# Altium PCB TB GPIO Trans Plug ver..PcbDoc
Units mil, origin at the board's own origin, x right, y up, seen from the top; angles counter-clockwise.
Board outline 825.58 x 762.57 mil, 2 copper layers (Top Layer, Bottom Layer); 4 components, 12 nets, 39 pads, 0 vias.
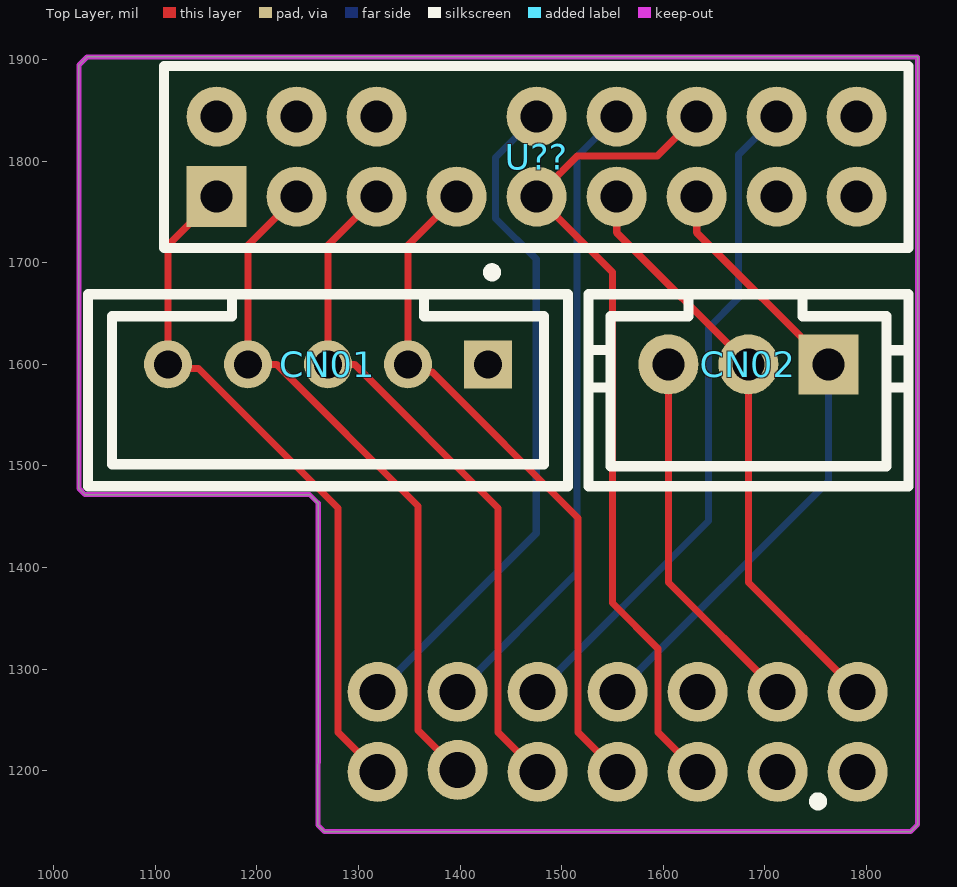
[diagram p0: Top Layer view]
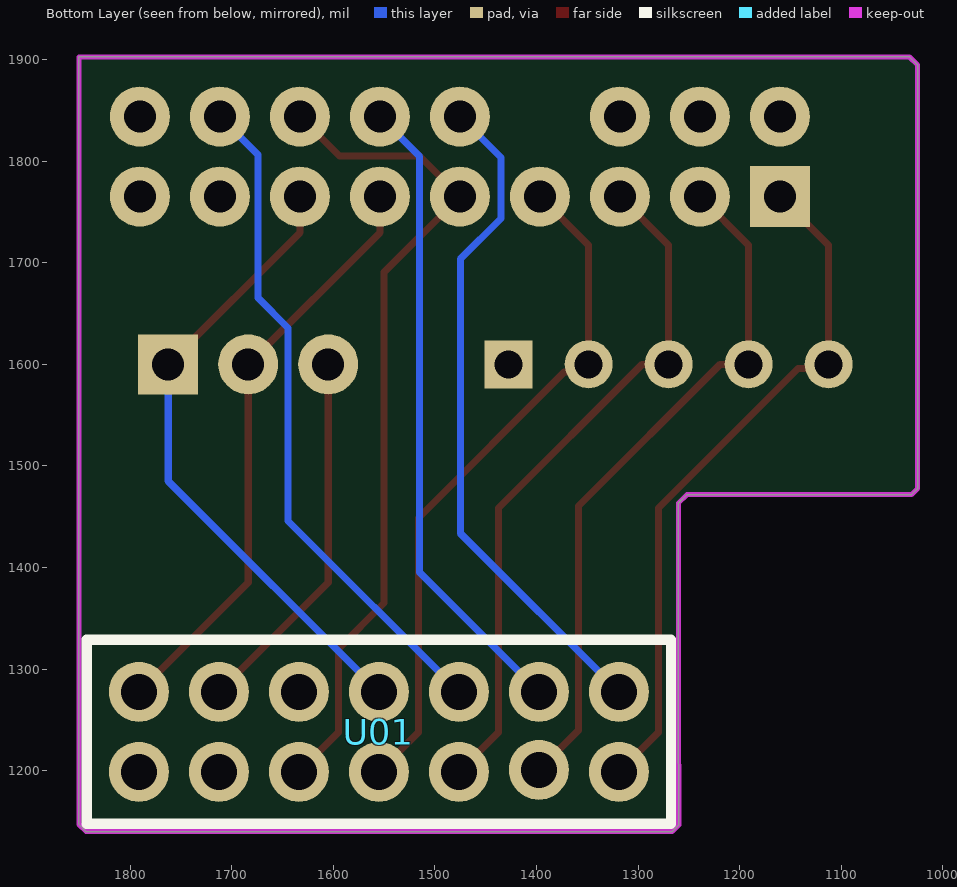
[diagram p1: Bottom Layer view, seen from below]

## Layer stack, top to bottom
Top Solder: solder mask 0.4, Solder Resist, Dk 3.5
Top Layer: signal copper 1.4
Dielectric 1: dielectric 12.6, FR-4, Dk 4.8
Bottom Layer: signal copper 1.4
Bottom Solder: solder mask 0.4, Solder Resist, Dk 3.5

## Board outline
1030.85,1471.72 1024.84,1477.73 1024.84,1894.57 1032.84,1902.57 1850.42,1902.57 1850.42,1147.13 1843.3,1140 1266.59,1140 1259.99,1146.6 1260.42,1266.93 1260.42,1463.24 1251.94,1471.72

## Design rules (kind name [scope] priority, off if disabled: settings)
Clearance [All] p1: gap=4.5 ignorepadtopadclearanceinfootprint=FALSE
PolygonConnect [All] p1: connectstyle=Relief reliefconductorwidth=10 reliefentries=4 polygonreliefangle="90 Angle" airgapwidth=10
RoutingVias [All] p1: holewidth=28 width=50 viastyle="Through Hole" minholewidth=28 minwidth=50 maxholewidth=28 maxwidth=50
SolderMaskExpansion [All] p1: expansion=4 istentingtop=FALSE
Width [All] p1: maxlimit=30 minlimit=4 preferedwidth=7
30 further rules are at their usual default settings.

## Components (designator, comment, footprint, x,y, rotation, side; value= is the part's Value field where it differs from the comment)
CN01 "hx-ph2.0-5pzz" CONN-TH_HX-PH2.0-5PZZ 1270,1600 r0 top
CN02 "hx-ph2.0-3pzz-b" CONN-TH_HX-PH2.0-3PZZ-B 1683.74,1600 r180 top
U01 "pm200-2-07-s-4.3-ASUS-Plug" HDR-TH_14P-P2.00-V-F-R2-C7-S2.00-3 1555.16,1238.28 r180 bottom
U?? "pm200-2-09-z-4.3_MSI_Socket" HDR-TH_18P-P2.00-V-F-R2-C9-S2.00-1-socket 1475.45,1804.49 r0 top

## Footprints (in the part's own frame and the unit in brackets; to place one, negate y for a bottom-side part, rotate by r counter-clockwise, add the part's x,y. Pads: shape width x height; smd on the part's side, far side on the other; paste and mask are expansions set on the pad)
CONN-TH_HX-PH2.0-3PZZ-B [mm]
  rect 1.5x1.5 hole 0.8: 1(-2,0)
  round 1.5 hole 0.8: 2(0,0) 3(2,0)
  silkscreen extent -4,-1.75 4,3.05
CONN-TH_HX-PH2.0-5PZZ [mm]
  rect 1.2x1.2 hole 0.7: 1(4,0)
  round 1.2 hole 0.7: 2(2,0) 3(0,0) 4(-2,0)
  round 1.2 hole 0.7 copper offset 0,0: 5(-4,0)
  silkscreen extent -6,-3.05 6,2.4
HDR-TH_14P-P2.00-V-F-R2-C7-S2.00-3 [mm]
  round 1.5 hole 0.9: 1(-6,-1) 2(-6,1) 3(-4,-1) 4(-4,1) 5(-2,-1) 6(-2,1) 7(0,-1) 8(0,1) 9(2,-1) 10(2,1) 11(4,-0.95) 12(4,1) 13(6,-1) 14(6,1)
  silkscreen extent -7.3,-2.3 7.3,2.3
HDR-TH_18P-P2.00-V-F-R2-C9-S2.00-1-socket [mm]
  rect 1.5x1.524 hole 0.8: 1(-8,-1)
  round 1.5 hole 0.8: 2(-8,1) 3(-6,-1) 4(-6,1) 5(-4,-1) 6(-4,1) 7(-2,-1) 9(0,-1) 10(0,1) 11(2,-1) 12(2,1) 13(4,-1) 14(4,1) 15(6,-1) 16(6,1) 17(8,-1) 18(8,1)
  silkscreen extent -9.32,-2.28 9.29,2.26

## Part data
CN01: "插针结构:1x5P;间距:2mm;安装方式:直插;参考系列:PH;总PIN数:5P;排数:1;每排PIN数:5;行距:-;额定电流:2A;触头材质:黄铜;触头镀层:锡;工作温度:-25℃~+85℃;", Color=白色, Current Rating=2A, Flame Retardant Rating=UL94V-0, JLCPCB Part Class="Extended Part", LCSC Part Name="1x5P 间距:2mm 直插 系列:PH", Manufacturer=hanxia(韩下), ManufacturerPart=HX-PH2.0-5PZZ, Operating Temperature=-25℃~+85℃, Voltage Rating=250V, AddInBom=yes, Contact Material=黄铜, Contact Plating=锡, ConvertToPcb=yes, Datasheet=https://item.szlcsc.com/datasheet/HX-PH2.0-5PZZ/50919866.html, FootprintName=CONN-TH_HX-PH2.0-5PZZ, Mounting Type=直插, Number of Pins=5P, Number of PINs Per Row=5, Number of Rows=1, Pins Structure=1x5P, Pitch=2mm, Plastic Material=PA66, Reference Series=PH, Row Spacing=-, Supplier=LCSC, Supplier Footprint=插件,P=2mm, SupplierPart=C48641620, Symbol=HX-PH2.0-5PZZ
CN02: "插针结构:1x3P;间距:2mm;安装方式:直插;参考系列:PH;总PIN数:3P;排数:1;每排PIN数:3;行距:-;额定电流:2A;触头材质:黄铜;触头镀层:锡;工作温度:-25℃~+85℃;", Color=黑色, Current Rating=2A, Flame Retardant Rating=UL94V-0, JLCPCB Part Class="Extended Part", LCSC Part Name="1x3P 间距:2mm 直插 系列:PH", Manufacturer=hanxia(韩下), ManufacturerPart=HX-PH2.0-3PZZ-B, Operating Temperature=-25℃~+85℃, Voltage Rating=250V, AddInBom=yes, Contact Material=黄铜, Contact Plating=锡, ConvertToPcb=yes, Datasheet=https://item.szlcsc.com/datasheet/HX-PH2.0-3PZZ-B/51365914.html, FootprintName=CONN-TH_HX-PH2.0-3PZZ-B, Mounting Type=直插, Number of Pins=3P, Number of PINs Per Row=3, Number of Rows=1, Pins Structure=1x3P, Pitch=2mm, Plastic Material=PA66, Reference Series=PH, Row Spacing=-, Supplementary Features=-, Supplier=LCSC, Supplier Footprint=插件,P=2mm, SupplierPart=C49009993, Symbol=HX-PH2.0-3PZZ-B, X-Length of Bottom Edge on Board (Spacing Line)=-, Y-Width of Bottom Edge on Board=-, Z-Height of the Board=-
U01: library part pm200-2-07-ASUS-TB-PLUG, "插孔结构:2x7P;间距:2mm;行距:2mm;圆孔/方孔:方孔;安装方式:立贴;排数:双排;总孔位数:14P;额定电流:1.5A;插孔方向:顶部;塑高:4.3mm;触头材质:黄铜;工作温度:-40℃~+105℃;", Current Rating=1.5A, JLCPCB Part Class="Extended Part", LCSC Part Name="2x7P 间距:2mm 立贴", Manufacturer=HCTL(华灿天禄), ManufacturerPart=PM200-2-07-S-4.3, Operating Temperature=-40℃~+105℃, AddInBom=yes, Circular Hole / Square Hole=方孔, Contact Material=黄铜, ConvertToPcb=yes, Datasheet=https://item.szlcsc.com/datasheet/PM200-2-07-S-4.3/4543722.html, FootprintName=HDR-SMD_14P-P2.00-V-F-R2-C7-LS6.5-A, Holes Direction=顶部, Holes Structure=2x7P, Insulation Height=4.3mm, Mounting Type=立贴, Number of Positions=14P, Number of Rows=双排, Pitch=2mm, Row Spacing=2mm, Supplier=LCSC, Supplier Footprint=SMD,P=2mm, SupplierPart=C3975171, Symbol=PM200-2-07-S-4.3
U??: library part pm200-2-09-z-4.3_Socket, "插孔结构:2x9P;间距:2mm;行距:2mm;圆孔/方孔:方孔;安装方式:直插;排数:双排;总孔位数:18P;额定电流:1.5A;插孔方向:顶部;塑高:4.3mm;触头材质:黄铜;工作温度:-40℃~+105℃;", Current Rating=1.5A, JLCPCB Part Class="Extended Part", LCSC Part Name="2x9P 间距:2mm 直插", Manufacturer=HCTL(华灿天禄), ManufacturerPart=PM200-2-09-Z-4.3, Operating Temperature=-40℃~+105℃, AddInBom=yes, Circular Hole / Square Hole=方孔, Contact Material=黄铜, ConvertToPcb=yes, Datasheet=https://item.szlcsc.com/datasheet/PM200-2-09-Z-4.3/3516644.html, FootprintName=HDR-TH_18P-P2.00-V-F-R2-C9-S2.00-1, Holes Direction=顶部, Holes Structure=2x9P, Insulation Height=4.3mm, ModelId=27f2729bd6294aaf8e872fe91d00ea97, ModelName=HDR-TH_18P-P2.00-V-F-R2-C9-S2.00-1, ModelTransform=732.282,177.165,0,0,0,0,0,0,-118.11, Mounting Type=直插, Number of Positions=18P, Number of Rows=双排, Pitch=2mm, Row Spacing=2mm, Supplier=LCSC, Supplier Footprint=插件,P=2mm, SupplierPart=C3012173, Symbol=PM200-2-09-Z-4.3_C3012173

## Nets (pads, with @x,y where several pads share a name; then routed paths per layer and width w, separated by ;. In a path a pad name is that pad's centre, name@x,y a point inside that pad or via, vN(x,y) a via of type N, cw(c..) or ccw(c..) an arc to the next point about the centre after c; other vN are vias at no path point)
GND: U01.5 U??.9 U??.14 | length 821.9
  Top Layer w7: U??.14 1594.07,1805 1515.33,1805 U??.9 1550,1690.57 1550,1365 1594.96,1320.04 1594.96,1237.85 U01.5
IRQ#: U01.10 U??.16 | length 663.7
  Bottom Layer w7: U01.10 1644.52,1445.76 1644.52,1635.84 1674.14,1665.45 1674.14,1806.33 U??.16
NC: U01.3
S_SLP_S3#: CN01.3 U01.9 U??.5 | length 686.8
  Top Layer w7: U??.5 1270,1717.15 CN01.3 1295.99,1600 1437.48,1458.51 1437.48,1237.85 U01.9
S_SLP_S5#: CN01.2 U01.7 U??.7 | length 681.1
  Top Layer w7: U??.7 1348.74,1717.15 CN01.2 1356.44,1592.3 1372.7,1592.3 1516.22,1448.78 1516.22,1237.85 U01.7
TB_CIO_PLUG_EVENT: CN01.4 U01.11 U??.3 | length 686
  Top Layer w7: U??.3 1191.26,1717.15 CN01.4 1219.22,1600 1358.74,1460.48 1358.74,1239.81 U01.11
TB_FORCE_PWR: CN01.5 U01.13 U??.1 | length 686.8
  Top Layer w7: U??.1 1112.52,1717.15 CN01.5 1116.55,1595.96 1142.54,1595.96 1280,1458.51 1280,1237.84 U01.13
TB_I2C1_SCL: U01.14 U??.10 | length 664.2
  Bottom Layer w7: U01.14 1475,1433.72 1475,1703.54 1435,1743.54 1435,1803.41 U??.10
TB_I2C1_SDA: U01.12 U??.12 | length 631
  Bottom Layer w7: U01.12 1515,1394.98 1515,1804.67 U??.12
TB_PERST_GPIO_N: CN02.3 U01.4 | length 366.9
  Top Layer w7: CN02.3 1605,1385.29 U01.4
TB_RTD3_POWER_EN: CN02.1 U01.8 U??.13 | length 627
  Top Layer w7: U??.13 1632.93,1729.55 CN02.1
  Bottom Layer w7: U01.8 1762.48,1484.98 CN02.1
TB_RTD3_WAKE#: CN02.2 U01.2 U??.11 | length 585.7
  Top Layer w7: U??.11 1554.19,1729.55 CN02.2 1683.74,1385.29 U01.2
pads on no net: CN01.1 U01.1 U01.6 U??.2 U??.4 U??.6 U??.15 U??.17 U??.18

## Keep-outs
Keep-Out Layer:
  lines w5: 1024.84,1477.73 1024.84,1894.57 1032.84,1902.57 1076.59,1902.57 1850.42,1902.57 1850.42,1815.16 1850.42,1147.13 1843.3,1140 1266.59,1140 1259.99,1146.6 1260.42,1266.93 1260.42,1463.24 1251.94,1471.72 1030.85,1471.72 1024.84,1477.73

## Silkscreen, mask and mechanical layers (free items; w line width, h text height)
Top Overlay:
  circle w10: c1752.31,1169.81 r3.94